# Altium PCB RF recieving station Board.PcbDoc
Units mm, origin at the board's own origin, x right, y up, seen from the top; angles counter-clockwise.
Board outline 34.82 x 53.97 mm, 2 copper layers (Top Layer, Bottom Layer); 48 components, 39 nets, 224 pads, 47 vias.
Unrouted connection lines stored in the file: 1.
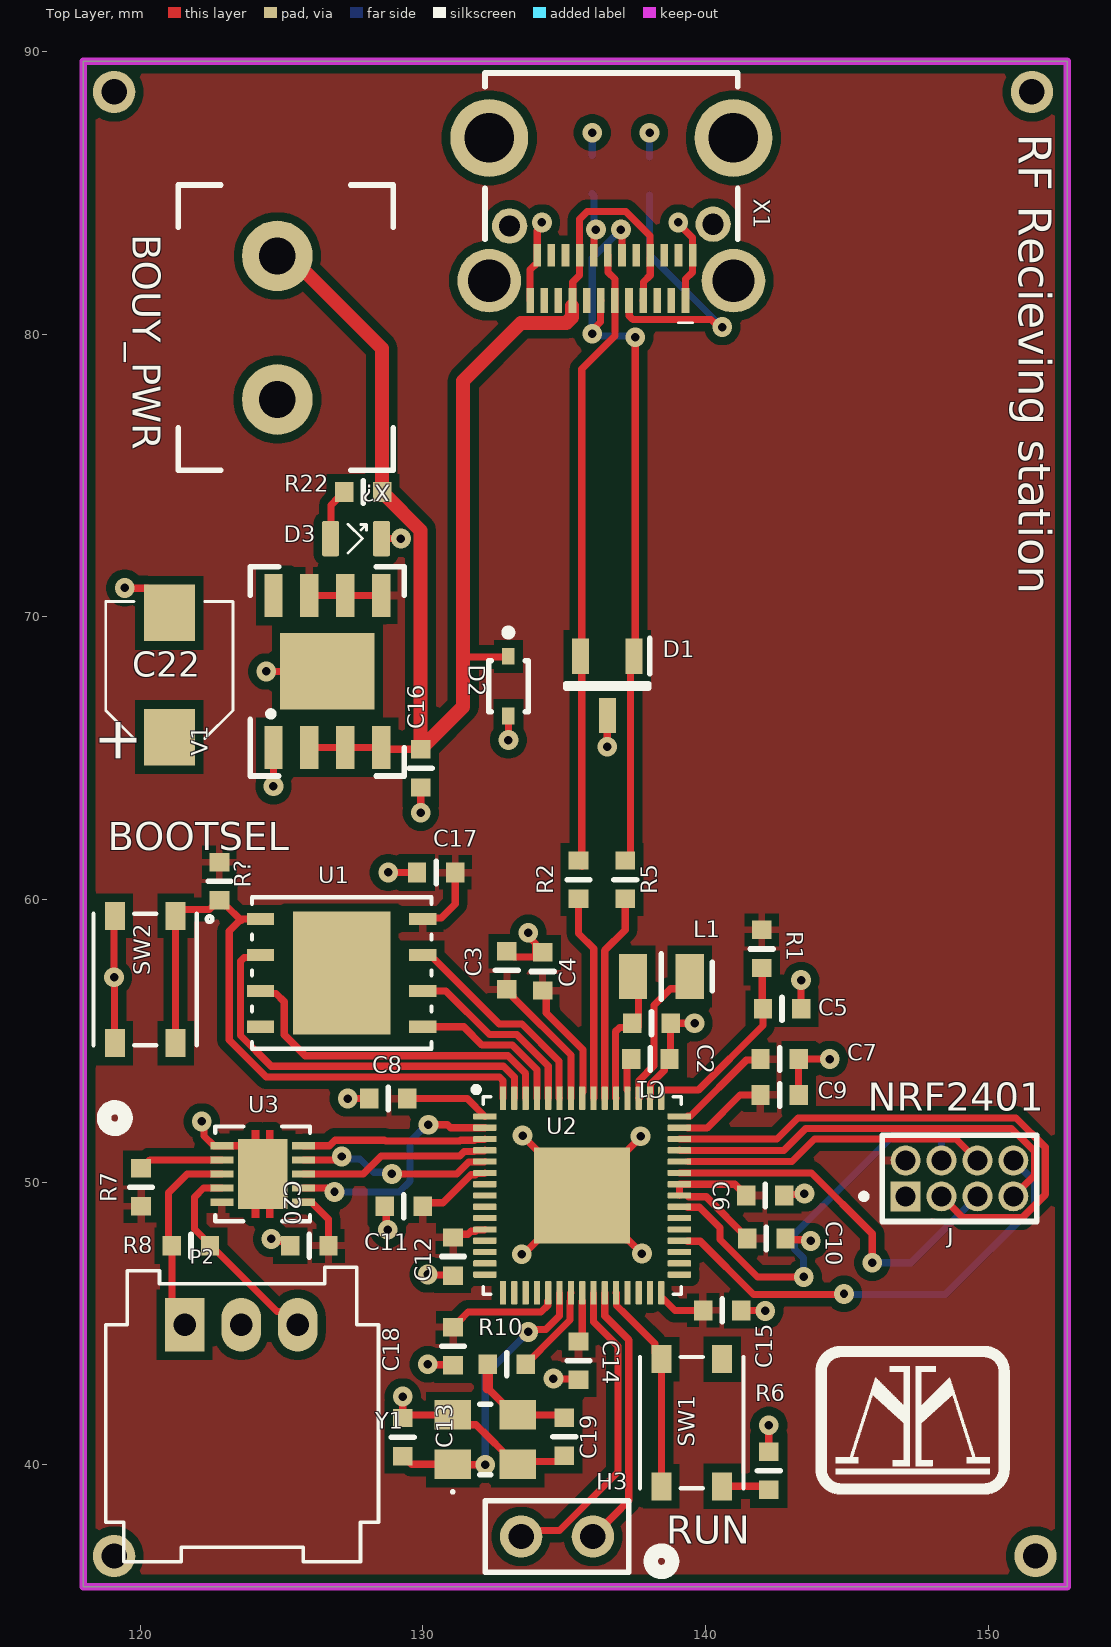
[diagram p0: Top Layer view]
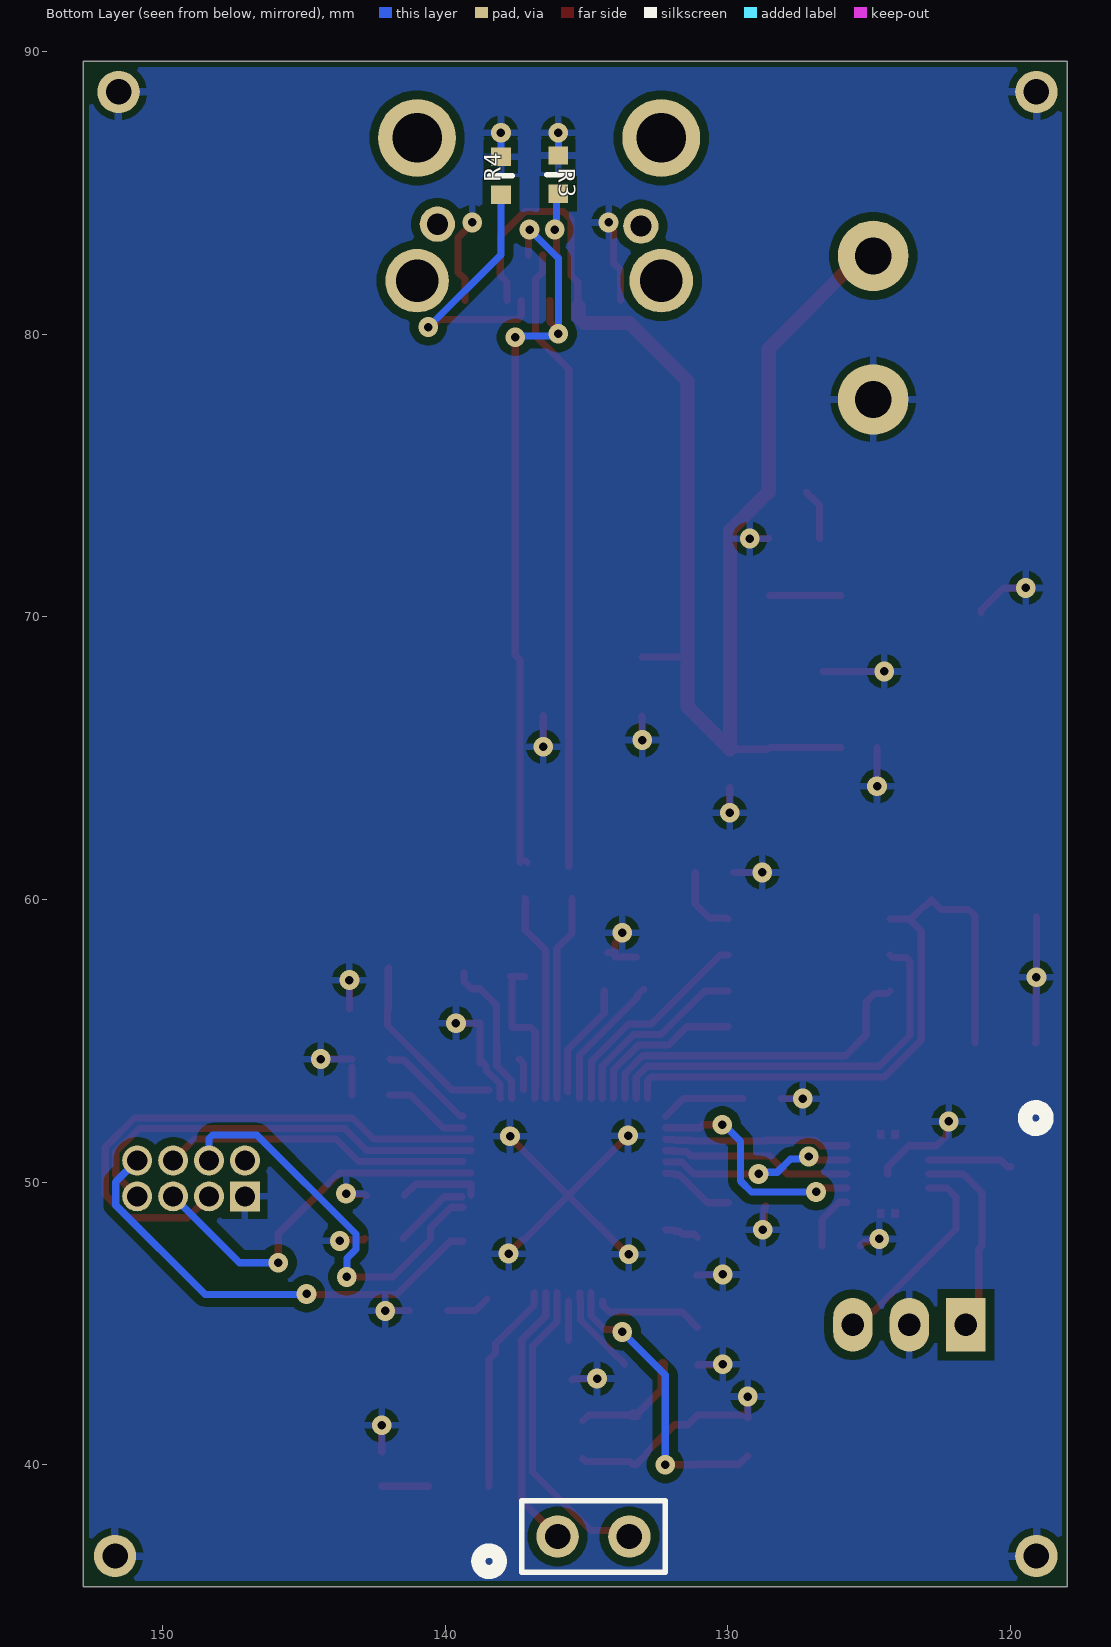
[diagram p1: Bottom Layer view, seen from below]
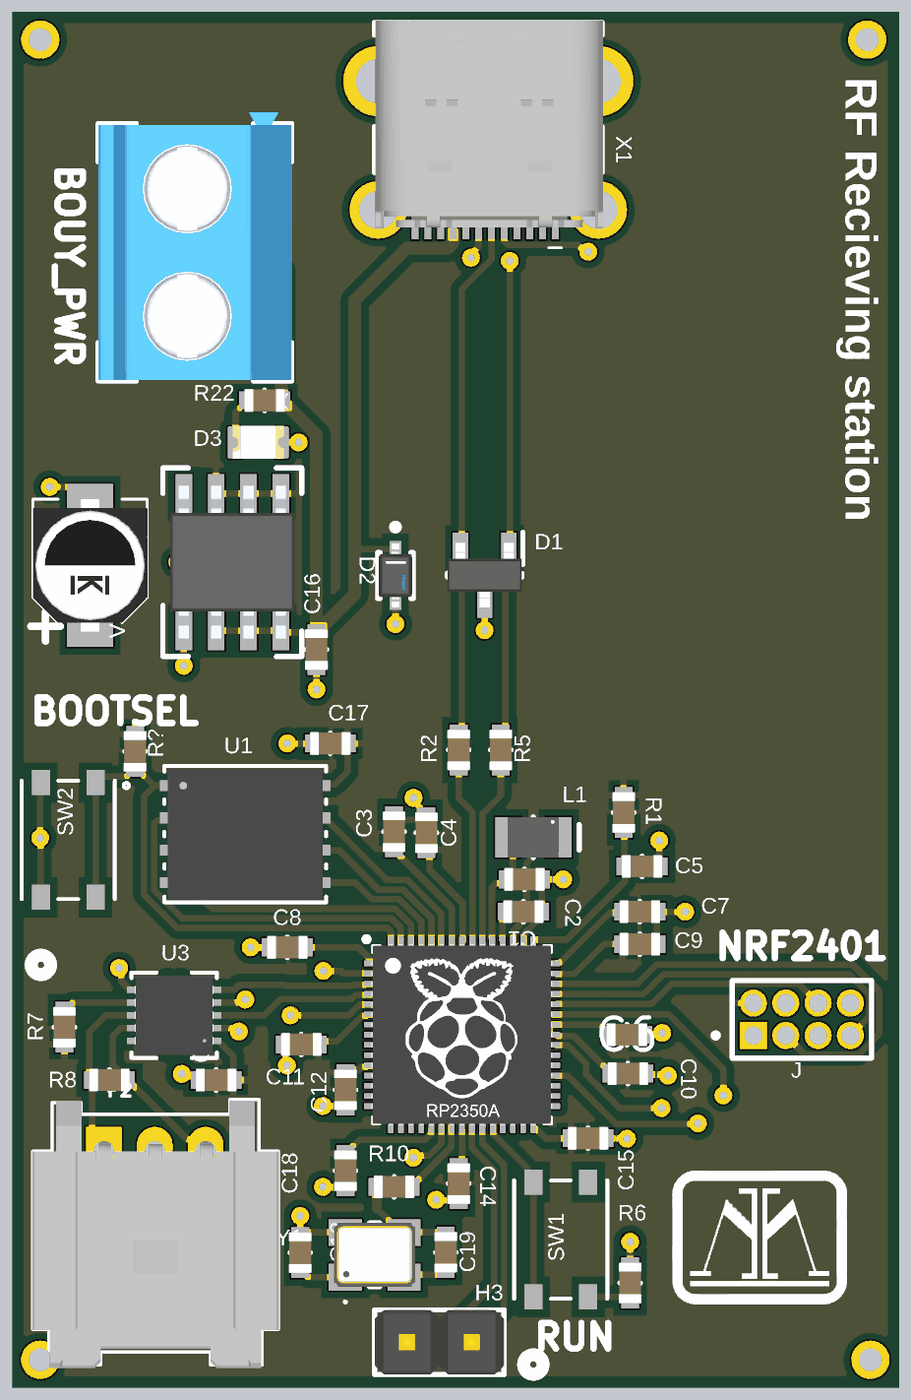
[diagram p2: 3D render of the assembled board from above, using the file's embedded part models]

## Layer stack, top to bottom
Top Solder: solder mask 0.0102, Solder Resist, Dk 3.5
Top Layer: signal copper 0.0356
Dielectric 1: dielectric 0.32, FR-4, Dk 4.8
Bottom Layer: signal copper 0.0356
Bottom Solder: solder mask 0.0102, Solder Resist, Dk 3.5

## Board outline
117.983,35.687 117.983,89.662 152.8,89.662 152.8,35.687

## Design rules (kind name [scope] priority, off if disabled: settings)
BoardOutlineClearance [All] p1: gap=0.2 ignorepadtopadclearanceinfootprint=FALSE
Clearance "inPolygon Clearance" [InPolygon] p1: gap=0.3 ignorepadtopadclearanceinfootprint=TRUE // this rule ensures that every net within a polygon of a different net has a set clearance from the poly
Clearance "Different Diff Pair" [All] p2: gap=0.2 ignorepadtopadclearanceinfootprint=TRUE
Clearance "Same Diff Pair" [All] p3: gap=0.1 ignorepadtopadclearanceinfootprint=TRUE
Clearance "Different Nets" [not InAnyDifferentialPair] p4: gap=0.3 ignorepadtopadclearanceinfootprint=TRUE except(0.1: Arc-SMDPad Arc-THPad Arc-Via Arc-Text Track-SMDPad Track-THPad Track-Via Track-Text SMDPad-Text THPad-Text Via-Text Fill-Text Poly-Text Region-Text Text-Text; 0.12: Arc-Arc Arc-Track Track-Track; 0.15: SMDPad-SMDPad SMDPad-THPad SMDPad-Via THPad-THPad THPad-Via Via-Via; 0.2: Arc-Hole Track-Hole SMDPad-Hole THPad-Hole Via-Hole Fill-Hole Poly-Hole Region-Hole Text-Hole)
Clearance "Same Net" [not InAnyDifferentialPair] p5: gap=0 ignorepadtopadclearanceinfootprint=TRUE except(0.1: THPad-Via; 0.18: Arc-Arc Arc-Track Track-Track)
ComponentClearance [All] p1: gap=0.102 collisioncheckmode=3 verticalgap=0.102 showdistances=TRUE
DiffPairsRouting "Ethernet Routing" [InDifferentialPairClass('Ethernet_Pairs')] p1: maxlimit=0.2 minlimit=0.2 mostfreqgap=0.2 toplayer_minwidth=0.25 toplayer_maxwidth=0.25 toplayer_prefwidth=0.25 bottomlayer_minwidth=0.25 bottomlayer_maxwidth=0.25 bottomlayer_prefwidth=0.25 impedanceprofiledriven=TRUE maxuncoupledlength=12.7
DiffPairsRouting "USB Routing" [InDifferentialPairClass('USB_Pairs')] p2: maxlimit=0.127 minlimit=0.127 mostfreqgap=0.127 toplayer_minwidth=0.23 toplayer_maxwidth=0.23 toplayer_prefwidth=0.23 bottomlayer_minwidth=0.23 bottomlayer_maxwidth=0.23 bottomlayer_prefwidth=0.23 impedanceprofiledriven=TRUE impedanceprofileid={F14BA31F-77FA-453E-8734-53F45B48A614} maxuncoupledlength=12.7
DiffPairsRouting "CAN Routing" [InDifferentialPairClass('CAN_Pairs')] p3: maxlimit=0.5 minlimit=0.5 mostfreqgap=0.5 toplayer_minwidth=0.201 toplayer_maxwidth=0.201 toplayer_prefwidth=0.201 bottomlayer_minwidth=0.201 bottomlayer_maxwidth=0.201 bottomlayer_prefwidth=0.201 impedanceprofiledriven=TRUE maxuncoupledlength=12.7
Height [All] p1: minheight=0 maxheight=1816.048 prefheight=12.7
HoleSize [All] p1: absolutevalues=TRUE maxlimit=6.3 minlimit=0.3 maxpercent=80.000 minpercent=20.000
HoleToHoleClearance [All] p1: gap=0.25 allowstackedmicrovias=FALSE
Length [All] p1: maxlimit=43.432 minlimit=0 usedelayunits=TRUE mindelay=0.000000 maxdelay=10000.000000
MatchedLengths "Diff Pair Matched Delays" [InDifferentialPairClass('Ethernet_Pairs') or InDifferentialPairClass('USB_Pairs') or InDifferentialPairClass('CAN_Pairs')] p1: tolerance=5 checknetsindiffpair=TRUE checkdiffpairvsdiffpair=FALSE checkxsignals=FALSE checkothers=FALSE usedelayunits=TRUE delaytolerance=100.000000
MinimumAnnularRing [All] p1: minimumring=0.2
MinimumSolderMaskSliver [All] p1: minsoldermaskwidth=0
PlaneClearance "Supply Net Clearance" [InNetClass('Supply_Nets')] p1: clearance=0.5
PlaneClearance "All Nets" [All] p2: clearance=0.3
PolygonConnect "Supply Nets" [InNetClass('Supply_Nets')] p1: connectstyle=Relief reliefconductorwidth=0.3 reliefentries=4 polygonreliefangle="90 Angle" conductorbypadedge=TRUE mindistance=0.381 enablemindistance=FALSE airgapwidth=0.254
PolygonConnect General [All] p2: connectstyle=Relief reliefconductorwidth=0.254 reliefentries=4 polygonreliefangle="90 Angle" airgapwidth=0.254
RoutingVias RoutingVias_1 [All] p1 off: holewidth=0.711 width=1.27 viastyle="Through Hole" minholewidth=0.711 minwidth=1.27 maxholewidth=0.711 maxwidth=1.27
RoutingVias [All] p2: holewidth=0.2 width=0.35 viastyle="Through Hole" minholewidth=0.15 minwidth=0.3 maxholewidth=6.3 maxwidth=6.55
SilkToSilkClearance [All] p1: silktosilkclearance=0
SilkToSolderMaskClearance [All] p1: minsilkscreentomaskgap=0 clearancetoexposedcopper=TRUE
SolderMaskExpansion [All] p1: expansion=0.075 istentingtop=FALSE
SupplyNets "Schematic Supply Nets_3" [InNet('GND')] p1: voltage=0.000
SupplyNets "Schematic Supply Nets_4" [InNet('+1V1')] p2: voltage=0.000
SupplyNets "Schematic Supply Nets_2" [InNet('+5V')] p3: voltage=0.000
SupplyNets "Schematic Supply Nets_7" [InNet('+3V3')] p4: voltage=0.000
UnRoutedNet [All] p1: checkbadconnections=TRUE
Width "nRF Width" [InNetClass('nRF Signal')] p1: maxlimit=0.379 minlimit=0.379 preferedwidth=0.379 impedanceprofiledriven=TRUE minimp=50.000000 maximp=50.000000 favimp=50.000000 checkconnectedcopper=TRUE
Width [All] p2: maxlimit=100 minlimit=0.1 preferedwidth=0.254
20 further rules are at their usual default settings.

## Classes and differential pairs
component class Core: C1 C2 C3 C4 C5 C6 C7 C8 C9 C10 C11 C12 C13 C14 C15 C16 C17 C18 C19 C20 D1 D2 D3 H3 J L1 P? R1 R2 R3 R4 R5 R6 R7 R8 R10 R? SW1 U1 U2 U3 V1 X1 X? Y1

## Components (designator, comment, footprint, x,y, rotation, side; value= is the part's Value field where it differs from the comment)
C1 "[Cap] 0603 4.7uF 10% 25V" "[Cap] SMD 0603" 138.089,55.626 r180 top
C2 "[Cap] 0603 4.7uF 10% 25V" "[Cap] SMD 0603" 138.049,54.356 r180 top
C3 "[Cap] 0603 0.1uF 10% 16V" "[Cap] SMD 0603" 132.969,57.498 r90 top
C4 "[Cap] 0603 0.1uF 10% 16V" "[Cap] SMD 0603" 134.239,57.458 r90 top
C5 "[Cap] 0603 4.7uF 10% 25V" "[Cap] SMD 0603" 142.708,56.134 r180 top
C6 "[Cap] 0603 0.1uF 10% 16V" "[Cap] SMD 0603" 142.113,49.53 r180 top
C7 "[Cap] 0603 0.1uF 10% 16V" "[Cap] SMD 0603" 142.621,54.356 r180 top
C8 "[Cap] 0603 0.1uF 10% 16V" "[Cap] SMD 0603" 128.778,52.959 r180 top
C9 "[Cap] 0603 0.1uF 10% 16V" "[Cap] SMD 0603" 142.621,53.086 r180 top
C10 "[Cap] 0603 0.1uF 10% 16V" "[Cap] SMD 0603" 142.153,48.006 r180 top
C11 "[Cap] 0603 0.1uF 10% 16V" "[Cap] SMD 0603" 129.326,49.149 r0 top
C12 "[Cap] 0603 0.1uF 10% 16V" "[Cap] SMD 0603" 131.064,47.371 r270 top
C13 "[Cap] 0603 0.1uF 10% 16V" "[Cap] SMD 0603" 131.064,44.196 r270 top
C14 "[Cap] 0603 4.7uF 10% 25V" "[Cap] SMD 0603" 135.509,43.688 r270 top
C15 "[Cap] 0603 0.1uF 10% 16V" "[Cap] SMD 0603" 140.589,45.466 r180 top
C16 "[Cap] 0603 0.1uF 10% 16V" "[Cap] SMD 0603" 129.921,64.643 r90 top
C17 "[Cap] 0603 0.1uF 10% 16V" "[Cap] SMD 0603" 130.469,60.96 r0 top
C18 "[Cap] 0603 15pF 1% 100V" "[Cap] SMD 0603" 129.286,40.981 r90 top
C19 "[Cap] 0603 15pF 1% 100V" "[Cap] SMD 0603" 135.003,40.994 r90 top
C20 "[Cap] 0603 0.1uF 10% 16V" "[Cap] SMD 0603" 125.984,47.752 r0 top
C22 "Comment" "[Cap] SMD Polarized, 4mm" 121.031,67.945 r90 top
D1 "TPD2E2U06QDBZRQ1" SOT95P237X95-3N 136.525,67.564 r270 top
D2 "DESD5V0S1BA-7" FP-SOD323-MFG 133.025,67.55 r270 top value=35pF
D3 "[LED] SMD 0805 Green" "[LED] SMD 0805" 127.635,72.771 r0 top
H3 "1x2 Header" "[Header] 1x2 Male" 134.747,37.465 r0 top
J "SFMC-104-01-L-D" SAMTEC_SFMC-104-01-L-D 147.08,49.5 r0 top
L1 "[3.3uH] SMD 0806 2.1A" "[Inductor] SMD 0806" 138.438,57.277 r180 top
P2 "3pos RA sherlock connector" MOLEX-HDR-1X3-SHERLOCK-RA 121.571,44.958 r180 top
R1 "[33] SMD 0603 0.5% 1/16W" "[Res] SMD 0603" 141.986,58.253 r270 top
R2 "[27] SMD 0603 1% 1/10W" "[Res] SMD 0603" 135.509,60.706 r90 top
R3 "[5.1k] SMD 0603 1% 1/10W" "[Res] SMD 0603" 138.022,85.61 r270 bottom
R4 "[5.1k] SMD 0603 1% 1/10W" "[Res] SMD 0603" 135.99,85.65 r90 bottom
R5 "[27] SMD 0603 1% 1/10W" "[Res] SMD 0603" 137.16,60.706 r90 top
R6 "[1k] SMD 0603 1% 1/10W" "[Res] SMD 0603" 142.24,39.791 r270 top
R7 "[1k] SMD 0603 1% 1/10W" "[Res] SMD 0603" 120.025,49.825 r90 top
R8 "[100] SMD 0603 1% 1/10W" "[Res] SMD 0603" 121.793,47.752 r180 top
R10 "[1k] SMD 0603 1% 1/10W" "[Res] SMD 0603" 132.969,43.561 r0 top
R22 "Comment" "[Res] SMD 0603" 127.889,74.422 r0 top
R? "[1k] SMD 0603 1% 1/10W" "[Res] SMD 0603" 122.8,60.65 r90 top
SW1 "PTS815 SJM 250 SMTR LFS" "SW4_PTS815 SJM 250 SMTR LFS_CNK"#1 139.514,41.493 r90 top
SW2 "PTS815 SJM 250 SMTR LFS" "SW4_PTS815 SJM 250 SMTR LFS_CNK"#2 120.175,57.175 r90 top
U1 "W25Q128JVPIQ" WSON_128JVPIQ_WIN 127.127,57.404 r0 top
U2 "RP2350A" "[MCU] RP2350A" 135.636,49.53 r0 top
U3 "THVD2410VDRCR" VSON10_DRC_TEX 124.333,50.292 r180 top
V1 "3V3 1.5A" "[Linear] 3V3 1.5A" 126.619,68.072 r90 top
X1 "USB-C" "[USB] USB-C Right-Angle" 136.669,85.162 r180 top
X? "2pin Screw Terminal" "[Screw Terminal] 2pin 5mm" 124.85,80.275 r270 top
Y1 "XTAL 12MHz" "[Crystal] SMD 12MHz" 132.207,40.894 r0 top

## Footprints (in the part's own frame and the unit in brackets; to place one, negate y for a bottom-side part, rotate by r counter-clockwise, add the part's x,y. Pads: shape width x height; smd on the part's side, far side on the other; paste and mask are expansions set on the pad)
"[Cap] SMD 0603" [mm]
  rect 0.65x0.7 smd: 1(-0.675,0) 2(0.675,0)
  silkscreen extent 0,-0.4 0,0.4, body extent -0.8,-0.45 0.8,0.45, height 0.8
"[Cap] SMD Polarized, 4mm" [mm]
  rect 2x1.8 smd: +3V3(-2.2,0) GND(2.2,0)
  silkscreen extent -2.25,-2.25 2.6,2.25, body extent -2.6,-2.25 2.6,2.25, height 5.66
"[Crystal] SMD 12MHz" [mm]
  rect 1.3x1.05 smd: 1(-1.15,-0.875) 2(1.15,-0.875) 3(1.15,0.875) 4(-1.15,0.875)
  silkscreen extent -1.2,-1.9 0.2,1.25, body extent -1.6,-1.25 1.6,1.25, height 0.75
"[Header] 1x2 Male" [mm]
  round 1.5 hole 0.9: 1(-1.27,0) 2(1.27,0)
  silkscreen extent -2.54,-1.27 2.54,1.27, body extent -2.54,-1.27 2.54,1.27, height 9.5
"[Inductor] SMD 0806" [mm]
  rect 1x1.6 smd: 1(-1,0) 2(1,0)
  silkscreen extent -1.8,-0.8 0,0.8, body extent -1,-0.8 1,0.8, height 1
"[LED] SMD 0805" [mm]
  rrect20% 0.6x1.25 smd: 1(-0.9,0) 2(0.9,0)
  silkscreen extent -0.28,-0.51 0.37,0.51, body extent -1,-0.65 1,0.65, height 0.8
"[Linear] 3V3 1.5A" [mm]
  rect 1.525x0.65 smd: 1(-2.688,1.905) 2(-2.688,0.635) 3(-2.688,-0.635) 4(-2.688,-1.905) 5(2.688,-1.905) 6(2.688,-0.635) 7(2.688,0.635) 8(2.688,1.905)
  rect 2.71x3.35 smd: 9(0,0)
  silkscreen extent -3.7,-2.73 3.7,2.73, body extent -3,-2.45 3,2.45, height 1.5
"[MCU] RP2350A" [mm]
  rrect25% 0.83x0.22 smd: 1(-3.44,2.8) 2(-3.44,2.4) 3(-3.44,2) 4(-3.44,1.6) 5(-3.44,1.2) 6(-3.44,0.8) 7(-3.44,0.4) 8(-3.44,0) 9(-3.44,-0.4) 10(-3.44,-0.8) 11(-3.44,-1.2) 12(-3.44,-1.6) 13(-3.44,-2) 14(-3.44,-2.4) 15(-3.44,-2.8) 31(3.44,-2.8) 32(3.44,-2.4) 33(3.44,-2) 34(3.44,-1.6) 35(3.44,-1.2) 36(3.44,-0.8) 37(3.44,-0.4) 38(3.44,0) 39(3.44,0.4) 40(3.44,0.8) 41(3.44,1.2) 42(3.44,1.6) 43(3.44,2) 44(3.44,2.4) 45(3.44,2.8)
  rrect25% 0.22x0.83 smd: 16(-2.8,-3.44) 17(-2.4,-3.44) 18(-2,-3.44) 19(-1.6,-3.44) 20(-1.2,-3.44) 21(-0.8,-3.44) 22(-0.4,-3.44) 23(0,-3.44) 24(0.4,-3.44) 25(0.8,-3.44) 26(1.2,-3.44) 27(1.6,-3.44) 28(2,-3.44) 29(2.4,-3.44) 30(2.8,-3.44) 46(2.8,3.44) 47(2.4,3.44) 48(2,3.44) 49(1.6,3.44) 50(1.2,3.44) 51(0.8,3.44) 52(0.4,3.44) 53(0,3.44) 54(-0.4,3.44) 55(-0.8,3.44) 56(-1.2,3.44) 57(-1.6,3.44) 58(-2,3.44) 59(-2.4,3.44) 60(-2.8,3.44)
  rect 3.4x3.4 smd paste-4: 61(0,0)
  silkscreen extent -3.85,-3.5 3.5,3.85, body extent -3.55,-3.55 3.55,3.55, height 0.96
"[Res] SMD 0603" [mm]
  rect 0.65x0.7 smd: 1(-0.675,0) 2(0.675,0)
  silkscreen extent 0,-0.4 0,0.4, body extent -0.8,-0.45 0.8,0.45, height 0.8
"[Screw Terminal] 2pin 5mm" [mm]
  round 2.5 hole 1.3: 1(-2.5,0) 2(2.58,0)
  silkscreen extent -5.01,-3.5 5.09,4.1, body extent -5.45,-3.5 5.05,4.1, height 9.99
"[USB] USB-C Right-Angle" [mm]
  rect 0.27x0.9 smd: A1(-2.625,3.965) A2(-2.125,3.965) A3(-1.625,3.965) A4(-1.125,3.965) A5(-0.625,3.965) A6(-0.125,3.965) A7(0.375,3.965) A8(0.875,3.965) A9(1.375,3.965) A10(1.875,3.965) A11(2.375,3.965) A12(2.875,3.965)
  rect 0.27x0.8 smd: B1(2.625,2.365) B2(2.125,2.365) B3(1.625,2.365) B4(1.125,2.365) B5(0.625,2.365) B6(0.125,2.365) B7(-0.375,2.365) B8(-0.875,2.365) B9(-1.375,2.365) B10(-1.875,2.365) B11(-2.375,2.365) B12(-2.875,2.365)
  round 2.25 hole 1.5: MH(-4.32,3.265) MH(4.32,3.265)
  round 2.75 hole 1.75: MH(-4.32,-1.785) MH(4.32,-1.785)
  round 1.25 hole 0.75: MH(-3.6,1.265) MH(3.6,1.33)
  silkscreen extent -4.47,-4.09 4.47,4.75, body extent -4.51,-4.16 4.43,4.01, height 2.92
FP-SOD323-MFG [mm]
  rect 0.59x0.45 smd paste+0 mask+0: 1(-1.055,0) 2(1.055,0)
  silkscreen extent -2.02,-0.7 0.9,0.7, body extent -1.45,-0.8 1.45,0.8, height 0.25
MOLEX-HDR-1X3-SHERLOCK-RA [mm]
  rect 1.397x1.905 hole 0.8: 1(0,0)
  oval 1.397x1.905 hole 0.8: 2(-2,0) 3(-4,0)
  silkscreen extent -6.86,-2.03 2.79,8.38, body extent -6.88,-1.99 2.82,8.51, height 5.75
SAMTEC_SFMC-104-01-L-D [mm]
  rect 1.06x1.06 hole 0.71: 01(0,0)
  round 1.06 hole 0.71: 02(0,1.27) 03(1.27,0) 04(1.27,1.27) 05(2.54,0) 06(2.54,1.27) 07(3.81,0) 08(3.81,1.27)
  silkscreen extent -1.58,-0.89 4.64,2.16
SOT95P237X95-3N [mm]
  rect 1.25x0.6 smd: 1(-1.05,0.95) 2(-1.05,-0.95) 3(1.05,0)
  silkscreen extent -1.68,-1.46 0.08,1.5, body extent -1.27,-1.46 1.27,1.46, height 1
"SW4_PTS815 SJM 250 SMTR LFS_CNK"#1 [mm]
  rect 0.991x0.711 smd paste+0 mask+0: 1(-2.25,1.075) 2(2.25,1.075) 3(-2.25,-1.075) 4(2.25,-1.075)
  silkscreen extent -5.28,-1.83 2.32,1.83
"SW4_PTS815 SJM 250 SMTR LFS_CNK"#2 [mm]
  rect 0.991x0.711 smd paste+0 mask+0: 1(-2.25,1.075) 2(2.25,1.075) 4(2.25,-1.075) ""(-2.25,-1.075)
  silkscreen extent -5.28,-1.83 2.32,1.83
VSON10_DRC_TEX [mil]
  rect 32x10 smd paste+0 mask+0: 1(-57,39.37) 2(-57,19.68) 3(-57,0) 4(-57,-19.68) 5(-57,-39.37) 6(57,-39.37) 7(57,-19.68) 8(57,0) 9(57,19.68) 10(57,39.37)
  rect 69x98 smd paste+0 mask+0: 11(0,0)
  Top Layer region: 5,-49 15,-49 15,-61 5,-61
  Top Layer region: -5,-49 -15,-49 -15,-61 -5,-61
  Top Layer region: 5,49 15,49 15,61 5,61
  Top Layer region: -5,49 -15,49 -15,61 -5,61
  silkscreen extent -66,-66 66,66, body extent -61,-61 61,61, height 39
WSON_128JVPIQ_WIN [mil]
  rect 38x17 smd paste+0 mask+0: 1(-113,75) 2(-113,25) 3(-113,-25) 4(-113,-75) 5(113,-75) 6(113,-25) 7(113,25) 8(113,75)
  rect 136x171 smd paste+0 mask+0: 9(0,0)
  silkscreen extent -188,-106 125,106, body extent -120,-101 120,101, height 32

## Part data
C1 C2 C5 C14: "GRM188R61E475KE11D", Capacitance=4.7uF, Max Voltage=25V, Size Package=0603, Supplier Part Number 1=490-7203-6-ND, Supplier 1=DigiKey
C3 C4 C8 C12: "CC0603KRX7R7BB104", Capacitance=100nF, Size Package=0603, Supplier Part Number 1=311-1088-6-ND, Supplier 1=DigiKey
C6 C7 C9 C10: "CC0603KRX7R7BB104", Capacitance=100nF, Max Voltage=16V, Size Package=0603, Supplier Part Number 1=311-1088-6-ND, Supplier 1=DigiKey
C11: "CC0603KRX7R7BB104", Capacitance=100nF, Supplier Part Number 1=311-1088-6-ND, Supplier 1=DigiKey
C13 C15 C16 C17 C20: "CC0603KRX7R7BB104", Capacitance=100nF, Max Voltage=16V, Size Package=0603, Supplier Part Number 1=311-1088-6-ND, Tolerance=10%, Supplier 1=DigiKey
C18 C19: "GCM1885C2A150FA16D", Capacitance=15pF, Max Voltage=100V, Size Package=0603, Supplier Part Number 1=490-16416-1-ND, Tolerance=1%, Supplier 1=DigiKey
D1: library part CMP-018-000010-3, "USB ESD Protection", Manufacturer_Name="Texas Instruments", Mouser Part Number=595-TPD2E2U06QDBZRQ1, Arrow Part Number=TPD2E2U06QDBZRQ1, Arrow Price/Stock=https://www.arrow.com/en/products/tpd2e2u06qdbzrq1/texas-instruments?region=nac, Datasheet Link=http://www.ti.com/lit/gpn/tpd2e2u06-q1, Design Item ID=TPD2E2U06QDBZRQ1, Height=0.95mm, Manufacturer_Part_Number=TPD2E2U06QDBZRQ1, Mouser Price/Stock=https://www.mouser.co.uk/ProductDetail/Texas-Instruments/TPD2E2U06QDBZRQ1?qs=ADSrZYdIRCdCCkTjX0u0BA%3D%3D, Source=SamacSys.SchLib
D2: library part CMP-12828-000011-1, "TVS DIODE 5V 14V SOD323", Breakdown Voltage=5.5V, Capacitance=35pF, Clamping Voltage=14V, Manufacturer="Diodes Inc", Max Junction Temp=+150°C, Package=SOD323, Peak Pulse Current=12A, Peak Pulse Power=130W, Reverse Standoff Voltage=5V, Temperature="-65°C to +150°C", Temperature Range Low=-65°C, Automotive=No, Category=Diode, ComponentLink2Description=Datasheet, ComponentLink2URL=https://www.diodes.com/assets/Datasheets/ds31275.pdf, Device Class L1="Circuit Protection", Device Class L2="TVS Diodes", Device Class L3=unset, Digikey Description="TVS DIODE 5V 14V SOD323", Direction=Bidirectional, Height=1.2mm, Lead Free=Yes, Manufacturer Part Number=DESD5V0S1BA-7, Mouser Description="TVS Diodes / ESD Suppressors Low Cap BI TVS Diode 130W 12A 200mW", Number of Channels=1, Octopart=https://octopart.com/desd5v0s1ba-7-diodes+inc.-23272867, RoHS=TRUE, Standoff Height=0.05mm, Temperature Range High=+150°C
D3: "LG R971-KN-1-0-20-R18", Color=Green, Size Package=0805, Supplier Part Number 1=475-LGR971-KN-1CT-ND, Supplier 1=DigiKey
H3: library part "[Header] 1x2 Male", "2.54mm pitch"
J: Package=None, Availability=Unavailable, MF=Samtec, MP=SFMC-104-01-L-D, Price=None
L1: "AOTA-B201610S3R3-101-T", Package=0806, Supplier Part Number 1=535-AOTA-B201610S3R3-101-TCT-ND, Supplier 1=DigiKey
P2: library part MOLEX-HDR-1x3-SHERLOCK_RA, "Header, Molex, 2mm Pitch Sherlock Header, Single Row, Right Angle 3 Circuits, Length 3.3mm", Manufacturer="Molex Connector Corporation", Manufacturer Part Number=35363-0360, Supplier Part Number 1=WM18932-ND, Supplier 1=Digi-Key
R1: "RR0816Q-330-D", Resistance=33, Size Package=0603, Supplier Part Number 1=RR08Q33DDKR-ND, Supplier 1=DigiKey
R2 R5: "MCT06030C2709FP500", Resistance=27, Size Package=0603, Supplier Part Number 1=749-1631-1-ND, Tolerance=1%, Supplier 1=DigiKey, Wattage=1/10W
R3 R4: "RC0603FR-075K1L", Resistance=5.1k, Size Package=0603, Supplier Part Number 1=311-5.10KHRCT-ND, Tolerance=1%, Supplier 1=DigiKey, Wattage=1/10W
R6 R7 R10 R?: "RMCF0603FT1K00", Resistance=1k, Size Package=0603, Supplier Part Number 1=RMCF0603FT1K00DKR-ND, Tolerance=1%, Supplier 1=DigiKey, Wattage=1/10W
R8: "RC0603FR-07100RL", Resistance=100, Size Package=0603, Supplier Part Number 1=311-100HRDKR-ND, Tolerance=1%, Supplier 1=DigiKey, Wattage=1/10W
SW1 SW2: "Description", Manufacturer_Name="C&K Components", Copyright="Copyright (C) 2026 Ultra Librarian. All rights reserved.", Manufacturer_Part_Number="PTS815 SJM 250 SMTR LFS", RefDes=RefDes, Type=Type
U1: "Description", Manufacturer_Name=Winbond, Copyright="Copyright (C) 2025 Ultra Librarian. All rights reserved.", Manufacturer_Part_Number=W25Q128JVPIQ, RefDes=RefDes, Type=Type
U2: library part "[MCU] RP2350A", "QFN-60 Package", Supplier Part Number 1=2648-SC1509-A4CT-ND, Supplier 1=DigiKey
U3: "3-V to 5.5-V, 1-Mbps, half-duplex RS-485 transceiver with flexible IO and 70-V bus-fault protection 10-VSON -40 to 125", Manufacturer_Name="Texas Instruments", Copyright="Copyright (C) 2026 Ultra Librarian. All rights reserved.", Manufacturer_Part_Number=THVD2410VDRCR, RefDes=RefDes, Type=Interface
V1: library part "[Linear] 3V3 1.5A", "AP7362A-33SP-13", Supplier Part Number 1=AP7362A-33SP-13DICT-ND, Supplier 1=DigiKey
X1: library part "[USB] Type-C Right-Angle", Supplier Part Number 1=670-3104-1-ND, Supplier 1=DigiKey
X?: library part "[Screw Terminal] 2pin", "TB002-500-02BE", Supplier Part Number 1=102-6145-ND, Supplier 1=DigiKey
Y1: library part "[Crystal] SMD 12MHz", "815-ABM8-272-T3", Supplier Part Number 1=535-ABM8-272-T3CT-ND, Supplier 1=DigiKey

## Free pads (board coordinates)
  round 1.5 hole 0.9: 5(151.55,88.575) 5(151.675,36.775) 7(119.075,88.575) 8(119.075,36.775)

## Via types
v1: diameter 0.7, hole 0.3, Top Layer to Bottom Layer, 47 vias

## Nets (pads, with @x,y where several pads share a name; then routed paths per layer and width w, separated by ;. In a path a pad name is that pad's centre, name@x,y a point inside that pad or via, vN(x,y) a via of type N, cw(c..) or ccw(c..) an arc to the next point about the centre after c; other vN are vias at no path point)
*RE: U2.5 U3.4 | length 6.9
  Top Layer w0.254: U3.4 126.888,50.792 127.006,50.91 v1(127.127,50.91) ; v1(128.905,50.292) 131.199,50.292 131.62,50.713 132.179,50.713 U2.5
  Bottom Layer w0.254: v1(127.127,50.91) 127.212,50.825 127.737,50.825 127.762,50.8 ; 127.777,50.824 128.248,50.353 128.844,50.353 v1(128.905,50.292)
+1V1: C1.2 L1.2 U2.50 | length 5.6
  Top Layer w0.254: U2.50 136.819,52.987 136.819,53.316 136.81,53.325 136.81,55.321 136.963,55.474 137.628,55.474 137.628,57.205 137.7,57.277 L1.2@137.176,57.277
+3V3: C2.2 C3.1 C4.1 C6.2 C7.2 C8.1 C9.2 C10.2 C11.2 C12.1 C13.1 C14.1 C15.2 C17.2 C20.2 J.02 R1.1 R7.1 R?.2 U1.8 U2.1 U2.6 U2.11 U2.20 U2.23 U2.30 U2.38 U2.39 U2.44 U2.45 U2.49 U2.53 U2.54 U3.1 U3.10 V1.5 V1.6 V1.7 | length 43.1
  Top Layer w0.254: U3.1 126.06,49.292 126.659,48.693 C20.2 ; V1.7 V1.6 V1.5 ; C8.1 131.567,52.959 U2.1 ; C11.2@129.97,49.276 130.712,49.276 131.703,50.267 131.804,50.267 131.862,50.267 131.908,50.313 132.179,50.313 U2.6 ; U1.8 130.042,59.354 130.651,59.354 131.144,59.846 C17.2 ; C13.1 131.089,44.871 131.287,45.069 131.287,45.094 131.601,45.408 134.184,45.408 134.419,45.643 U2.20@134.419,45.802 ; C12.1 131.176,48.158 131.594,48.158 131.703,48.267 131.862,48.267 131.908,48.313 132.179,48.313 U2.11 ; C3.1 132.994,56.823 133.192,56.625 133.192,56.546 135.236,54.502 U2.54 ; C4.1@134.366,56.783 134.366,55.992 135.67,54.688 U2.53@135.67,53.2 ; C14.1@135.636,44.403 U2.23@135.636,45.802 ; U2.49@137.219,53.258 137.219,54.201 C2.2 ; U2.30@138.516,45.865 138.916,45.466 C15.2 ; U2.38 U2.39 141.038,49.93 141.215,49.753 141.24,49.753 141.438,49.555 C6.2 ; U2.44@139.364,51.913 140.051,51.913 141.224,53.086 C9.2 C9.2@141.959,53.086 ; U2.45@139.364,52.347 139.469,52.347 141.441,54.319 141.909,54.319 C7.2 ; U2.38@139.4,49.485 140.024,49.485 141.478,48.031 C10.2
+5V: C16.2 D2.1 R22.2 V1.2 V1.3 V1.4 X1.A4 X1.A9 X1.B4 X1.B9 X?.1 | length 52.2
  Top Layer w0.254: V1.2 V1.3 V1.4 128.59,65.318 C16.2 ; 131.425,68.58 D2.1@133.025,68.58 ; X1.A9@135.302,81.197 135.302,81.848 135.544,82.09 X1.B4 135.544,84.075 135.809,84.34 137.187,84.34 138.036,83.491 138.036,82.805 X1.B9 138.044,82.09 137.802,81.848 137.802,81.205 X1.A4
  Top Layer w0.5: X?.1@124.467,82.577 X?.1@124.467,82.616 ; X?.1@125.226,82.824 128.547,79.503 128.547,74.414 128.639,74.322 128.66,74.322 129.921,73.061 C16.2 131.425,66.822 131.425,68.58 131.425,78.35 133.472,80.397 135.074,80.397 135.279,80.602 X1.A9@135.279,80.997
DE: U2.4 U3.3 | length 6.8
  Top Layer w0.254: U3.3 127.889,50.292 128.524,50.927 131.305,50.927 131.465,51.087 131.824,51.087 131.85,51.113 132.179,51.113 U2.4
GND: C1.1 C2.1 C3.2 C4.2 C5.1 C6.1 C7.1 C8.2 C9.1 C10.1 C11.1 C12.2 C13.2 C14.2 C15.1 C16.1 C17.1 C18.2 C19.1 C20.1 C22.GND D1.3 D2.2 D3.2 J.01 P2.2 pad.5 pad.7 pad.8 R3.1 R4.2 R6.1 SW2.1 SW2.2 U2.47 U2.61 U3.6 U3.11 V1.1 V1.9 X1.A1 X1.A12 X1.B1 X1.B12 X?.2 Y1.2 Y1.4 | length 62.4
  Top Layer w0.254: SW2.2@119.075,59.4 v1(119.075,57.25) 119.1,57.225 119.1,57.075 119.088,57.062 119.088,54.937 SW2.1 ; v1(119.45,71.025) 119.457,71.018 120.258,71.018 121.031,70.245 C22.GND ; v1(122.175,52.15) 122.26,52.065 122.26,51.637 122.606,51.292 123.584,51.292 124.333,50.543 U3.11 ; v1(124.46,68.072) V1.9 ; v1(124.634,47.993) 124.719,47.908 125.153,47.908 C20.1 ; v1(124.714,64.008) V1.1 ; v1(127.341,52.959) C8.2 ; D3.2 v1(129.221,72.771) ; C11.1 128.705,49.095 128.705,48.376 v1(128.76,48.322) ; v1(128.778,60.96) C17.1 ; v1(129.286,42.418) C18.2 129.399,41.769 Y1.4 131.406,41.42 131.883,41.42 132.33,40.973 132.834,40.469 132.834,40.417 133.232,40.019 Y1.2 133.456,40.119 135.028,40.119 C19.1@135.128,40.219 ; C16.1 129.923,63.966 129.923,63.077 v1(129.925,63.075) ; v1(130.175,43.561) 130.195,43.541 131.044,43.541 C13.2 ; v1@130.217,46.694 130.238,46.716 131.084,46.716 C12.2@131.106,46.694 ; v1(133.025,65.645) D2.2 ; C3.2@133.223,57.966 C4.2@133.985,57.966 ; v1(133.5,47.45) 133.556,47.45 U2.61 ; v1(133.525,51.65) 133.525,51.641 U2.61 ; v1(133.731,58.824) 133.731,58.704 133.985,58.45 133.985,58.133 C4.2 ; X1.A12 133.794,82.282 134.044,82.532 X1.B1 134.044,83.67 134.212,83.838 v1(134.212,83.959) ; v1(134.62,43.053) 134.64,43.033 135.489,43.033 C14.2 ; v1(136.525,65.405) D1.3 ; v1(137.7,51.625) 137.7,51.594 U2.61 ; v1(137.75,47.475) 137.268,47.957 137.209,47.957 U2.61 ; U2.47 138.053,52.987 138.053,53.471 138.546,53.964 138.546,54.133 138.642,54.229 138.764,54.229 C1.1 v1(139.613,55.626) ; v1(139.038,83.959) 139.038,83.923 139.544,83.417 X1.B12 139.536,82.789 139.536,82.196 139.294,81.954 X1.A1 ; C15.1 141.273,45.457 142.104,45.457 v1(142.113,45.448) ; R6.1 v1(142.24,41.402) ; C6.1 142.823,49.565 143.465,49.565 v1(143.5,49.6) ; C10.1 142.869,47.965 143.685,47.965 v1(143.725,47.925) ; C9.1@143.286,53.086 C7.1@143.286,54.072 ; C7.1 v1(144.399,54.356) ; C5.1 v1(143.383,57.15)
  Bottom Layer w0.254: R4.2 v1(135.99,87.134) ; R3.1 v1(138.022,87.134)
  other v1: 130.175,46.736
NetC5_2: C5.2 R1.2 U2.46 | length 6.6
  Top Layer w0.254: U2.46@138.453,53.258 139.745,53.258 142.033,55.546 C5.2 ; R1.2 142.01,57.555 C5.2@142.01,56.134
NetC19_2: C19.2 R10.1 Y1.3 | length 4.2
  Top Layer w0.254: 132.294,42.707 Y1.3@133.232,41.769 ; Y1.3 134.903,41.769 135.103,41.569 C19.2@135.128,41.569
  Top Layer w0.381: 132.294,42.707 R10.1 ; Y1.3@133.232,41.769 Y1.3
NetL1_1: L1.1 U2.48 | length 5.3
  Top Layer w0.254: U2.48 137.653,52.987 137.653,53.6 138.172,54.119 138.172,54.903 138.18,54.911 138.18,56.265 138.758,56.843 139.065,56.843 139.327,57.105 L1.1@139.327,57.412
NetR3_2: R3.2 X1.A5 | length 9.8
  Top Layer w0.254: X1.A5 137.302,81.189 137.302,80.647 137.429,80.52 140.197,80.52 140.281,80.437 140.291,80.437 140.473,80.255 v1(140.594,80.255)
  Bottom Layer w0.254: R3.2 138.022,82.816 140.583,80.255 v1(140.594,80.255)
NetR4_1: R4.1 X1.B5 | length 2.3
  Top Layer w0.254: X1.B5 136.052,82.805 136.052,83.636 v1(136.121,83.705)
  Bottom Layer w0.254: R4.1 136.056,84.909 136.056,83.771 v1(136.121,83.705)
NetR6_2: R6.2 SW1.3 | length 1.6
  Top Layer w0.254: SW1.3 R6.2@142.236,39.243
NetR7_2: R7.2 U3.7 | length 3
  Top Layer w0.254: R7.2@119.979,50.55 120.1,50.55 120.342,50.792 U3.7
QSPI_MEM_CLK: U1.6 U2.56 | length 6.7
  Top Layer w0.254: U1.6 130.81,56.769 132.355,55.224 133.322,55.224 134.436,54.11 U2.56
QSPI_MEM_CS: R?.1 SW2. SW2.4 U1.1 U2.60 | length 23.4
  Top Layer w0.254: SW2. SW2.4 121.479,59.654 122.454,59.654 122.775,59.975 R?.1 122.998,59.777 123.054,59.777 123.547,59.285 ; U1.1 123.571,59.309 123.571,59.26 123.547,59.285 ; U2.60 132.836,53.594 132.709,53.721 124.46,53.721 123.15,55.031 123.15,58.888 123.547,59.285
QSPI_MEM_D2: U1.3 U2.58 | length 12.2
  Top Layer w0.254: U1.3 124.346,56.68 124.803,56.68 125.095,56.388 125.095,55.216 125.835,54.476 133.012,54.476 133.636,53.852 U2.58
QSPI_MEM_D3: U1.7 U2.55 | length 7.7
  Top Layer w0.254: U1.7 130.264,58.039 132.705,55.598 133.505,55.598 134.819,54.284 134.819,52.987 U2.55
QSPI_MEM_SD0: U1.5 U2.57 | length 5.7
  Top Layer w0.254: U1.5 131.445,55.499 132.094,54.85 133.167,54.85 134.036,53.981 U2.57
QSPI_MEM_SD1: U1.2 U2.59 | length 14.5
  Top Layer w0.254: U1.2 124.168,57.95 123.677,57.95 123.547,57.82 123.547,55.189 124.634,54.102 132.857,54.102 133.236,53.723 U2.59
R22: D3.1 R22.1 | length 1.9
  Top Layer w0.254: D3.1 126.746,72.782 126.746,73.954 126.991,74.199 127.016,74.199 127.214,74.397 R22.1
RF_CS: J.04 U2.37 | length 14.5
  Top Layer w0.254: U2.37@139.364,49.113 139.366,49.111 139.789,49.111 140.511,48.389 140.511,47.977 141.838,46.65 v1(143.475,46.65)
  Bottom Layer w0.254: v1(143.475,46.65) 143.472,46.653 143.472,47.307 143.148,47.631 143.148,48.164 146.659,51.675 148.223,51.675 148.35,51.548 J.04
RF_EN: J.03 U2.43 | length 19.7
  Top Layer w0.254: U2.43 142.53,51.53 143.275,52.275 150.984,52.275 152.021,51.238 152.021,49.56 151.204,48.743 149.107,48.743 J.03
RF_IRQ: J.08 U2.34 | length 16.3
  Top Layer w0.254: U2.34@139.364,47.913 139.812,47.913 141.7,46.025 144.875,46.025 v1(144.9,46.05)
  Bottom Layer w0.254: v1(144.9,46.05) 144.925,46.025 148.486,46.025 151.647,49.186 151.647,50.013 J.08
RF_MISO: J.07 U2.42 | length 15.1
  Top Layer w0.254: U2.42 139.084,51.122 142.766,51.122 143.545,51.901 150.83,51.901 151.647,51.084 151.647,50.257 J.07
RF_MOSI: J.06 U2.41 | length 10.9
  Top Layer w0.254: U2.41@139.364,50.73 143.062,50.73 143.859,51.527 148.863,51.527 J.06
RF_SCK: J.05 U2.40 | length 13.4
  Top Layer w0.254: U2.40 143.745,50.33 145.9,48.175 v1(145.9,47.15)
  Bottom Layer w0.254: v1(145.9,47.15) 147.27,47.15 J.05
RS-485+: P2.1 R8.2 U3.8 | length 7.1
  Top Layer w0.254: P2.1 121.118,45.411 121.118,47.633 120.999,47.752 120.999,49.625 121.666,50.292 U3.8
RS-485-: P2.3 R8.1 U3.9 | length 7.3
  Top Layer w0.254: U3.9 122.24,49.792 121.92,49.472 121.92,48.348 124.838,45.431 125.098,45.431 P2.3
RS_UART_RX: U2.3 U3.5 | length 6.5
  Top Layer w0.254: U3.5 126.693,51.292 126.888,51.487 128.645,51.487 128.676,51.457 131.306,51.457 131.336,51.487 131.824,51.487 131.85,51.513 132.179,51.513 U2.3
RS_UART_TX: U2.2 U3.2 | length 8.3
  Top Layer w0.254: U3.2 126.617,49.792 126.752,49.657 v1(126.873,49.657) ; v1(130.194,52.034) 130.874,52.034 130.978,51.93 U2.2
  Bottom Layer w0.254: v1(126.873,49.657) 129.159,49.657 129.54,50.038 129.54,51.441 130.133,52.034 v1(130.194,52.034)
RUN: SW1.1 SW1.2 U2.26 | length 7.5
  Top Layer w0.254: U2.26 136.853,46.073 136.853,45.643 137.048,45.448 137.051,45.448 138.21,44.289 138.21,43.958 SW1.2@138.426,43.743 ; SW1.1 SW1.2
SWCLK: H3.1 U2.24 | length 11.1
  Top Layer w0.254: H3.1 133.69,37.678 134.833,37.678 136.906,39.751 136.906,44.196 136.036,45.066 U2.24
SWDIO: H3.2 U2.25 | length 9.5
  Top Layer w0.254: H3.2 136.753,38.2 137.287,38.735 137.287,44.423 136.436,45.274 U2.25
USB_D+: D1.2 R2.2 X1.A6 X1.B6 | length 22.2
  Top Layer w0.254: R2.2@135.621,61.182 135.621,68.614 135.621,78.773 136.794,79.946 X1.A6 136.794,81.954 136.552,82.196 136.552,82.789 X1.B6
USB_D+_RP2350: R2.1 U2.52 | length 7.3
  Top Layer w0.254: R2.1 135.509,58.801 136.044,58.266 136.044,52.978 U2.52
USB_D-: D1.1 R5.2 X1.A7 X1.B7 | length 26.5
  Top Layer w0.254: v1(135.99,80.022) 135.99,80.143 136.287,80.44 136.287,81.19 X1.A7 ; v1(137.006,83.705) 137.044,83.667 X1.B7 ; R5.2@137.099,61.32 R5.2 ; R5.2@137.348,61.315 137.348,68.487 137.514,68.653 v1(137.514,79.895)
  Bottom Layer w0.254: v1(135.99,80.022) 135.99,82.689 136.036,82.735 v1(137.006,83.705) ; v1@136.075,79.937 137.472,79.937 v1(137.514,79.895)
USB_D-_RP2350: R5.1 U2.51 | length 7.4
  Top Layer w0.254: U2.51 136.436,58.204 137.16,58.928 R5.1
XIN: C18.1 U2.21 Y1.1 | length 10.5
  Top Layer w0.254: C18.1 129.311,40.306 129.598,40.019 Y1.1 131.071,40.005 v1(132.207,40.005) ; v1(133.731,44.704) 133.816,44.789 134.347,44.789 134.836,45.279 U2.21
  Bottom Layer w0.254: v1(132.207,40.005) 132.207,43.18 v1(133.731,44.704)
XOUT: R10.2 U2.22 | length 3.2
  Top Layer w0.254: R10.2 133.644,43.586 133.842,43.784 133.867,43.784 134.498,44.415 134.502,44.415 135.21,45.124 135.21,45.793 135.219,45.802 135.219,46.073 U2.22
pads on no net: C22.+3V3 SW1.4 U1.4 U1.9 U2.7 U2.8 U2.9 U2.10 U2.12 U2.13 U2.14 U2.15 U2.16 U2.17 U2.18 U2.19 U2.27 U2.28 U2.29 U2.31 U2.32 U2.33 U2.35 U2.36 V1.8 X1.A2 X1.A3 X1.A8 X1.A10 X1.A11 X1.B2 X1.B3 X1.B8 X1.B10 X1.B11 X1.MH

## Polygon pours and split planes (outlines as drawn)
GND on Bottom Layer "NONET_L01_P-001" (solid, remove dead copper, pour order 0): 117.338,90.662 153.75,90.662 153.75,35.175 117.515,35.175
+3V3 on Top Layer "NONET_L01_P-001" (solid, remove dead copper, pour order 2): 117.525,89.761 153.3,89.761 153.3,35.687 117.525,35.687

## Keep-outs
Top Layer:
  lines w0.254: 117.983,35.687 152.8,35.687 152.8,89.662 117.983,89.662 117.983,72.517 117.983,66.675 117.983,35.687

## Silkscreen, mask and mechanical layers (free items; w line width, h text height)
Top Overlay:
  drawing of 4 lines, arcs and shapes, not listed
  text "RF Recieving station" at 150.7,87.1 h2 r270
  text "BOUY_PWR" at 119.733,83.532 h1 r270
  text "BOOTSEL" at 118.843,61.75 h1
  text "NRF2401" at 145.734,52.525 h1
  text "RUN" at 138.617,37.2 h1

## Text inside footprints (layer, text, board x,y; h text height)
C22: Top Overlay "+" at 119.876,64.778 h1.5 r90